# Altium PCB PCB1.PcbDoc
Units mil, origin at the board's own origin, x right, y up, seen from the top; angles counter-clockwise.
Board outline 1705 x 790 mil, 4 copper layers (Top Layer, InLayer 1, InLayer 2, Bottom Layer), stack 26.268 mil thick; 14 components, 24 nets, 115 pads, 0 vias.
Unrouted connection lines stored in the file: 50.
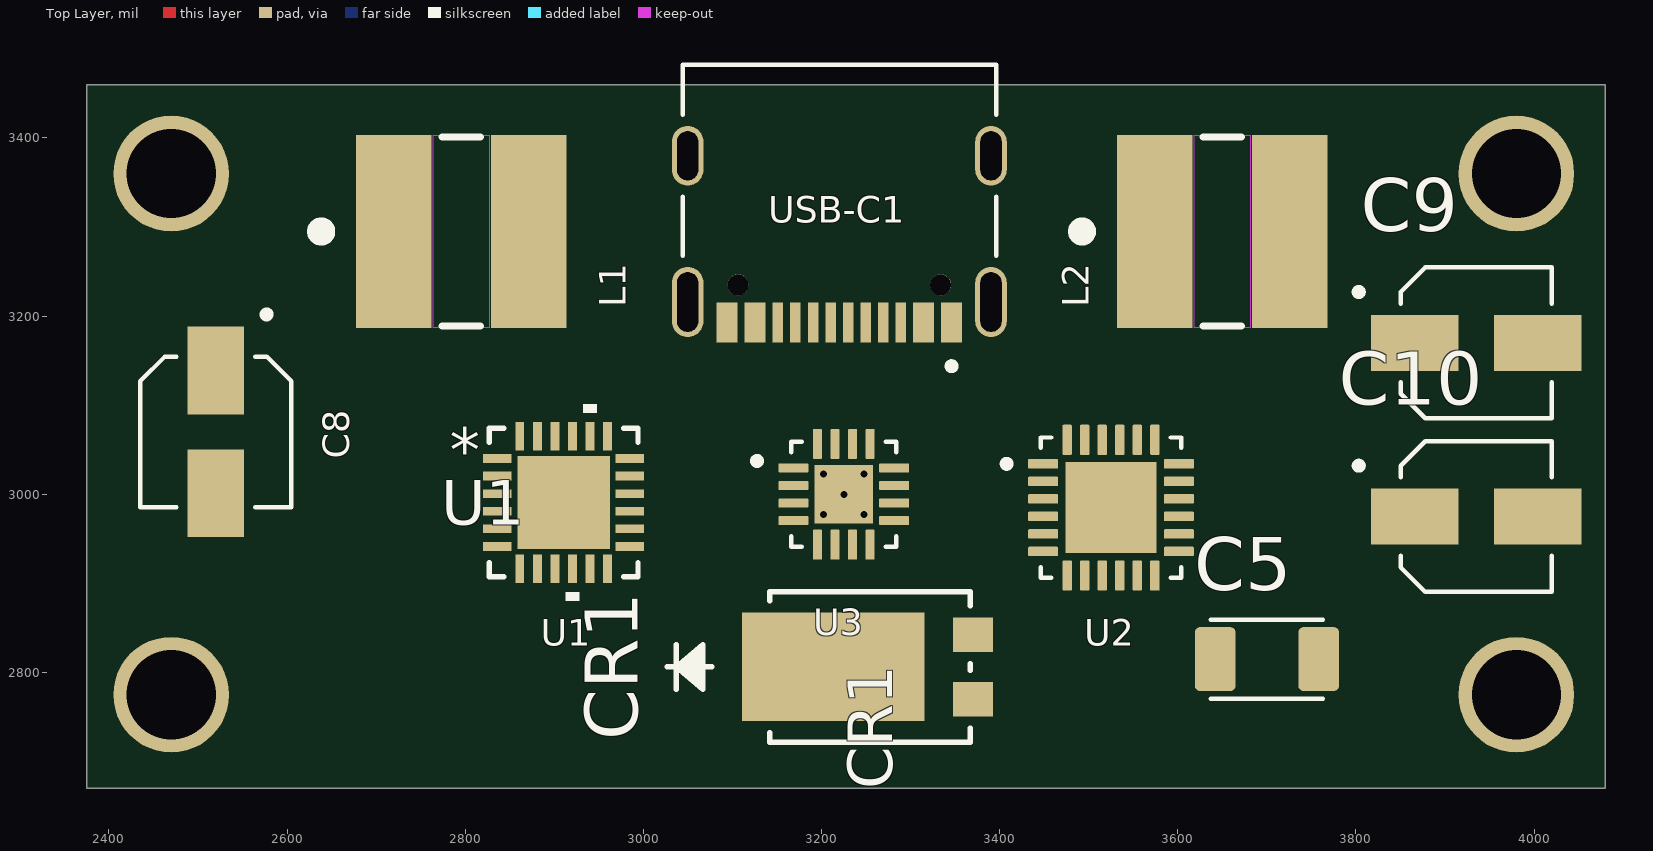
[diagram p0: Top Layer view]
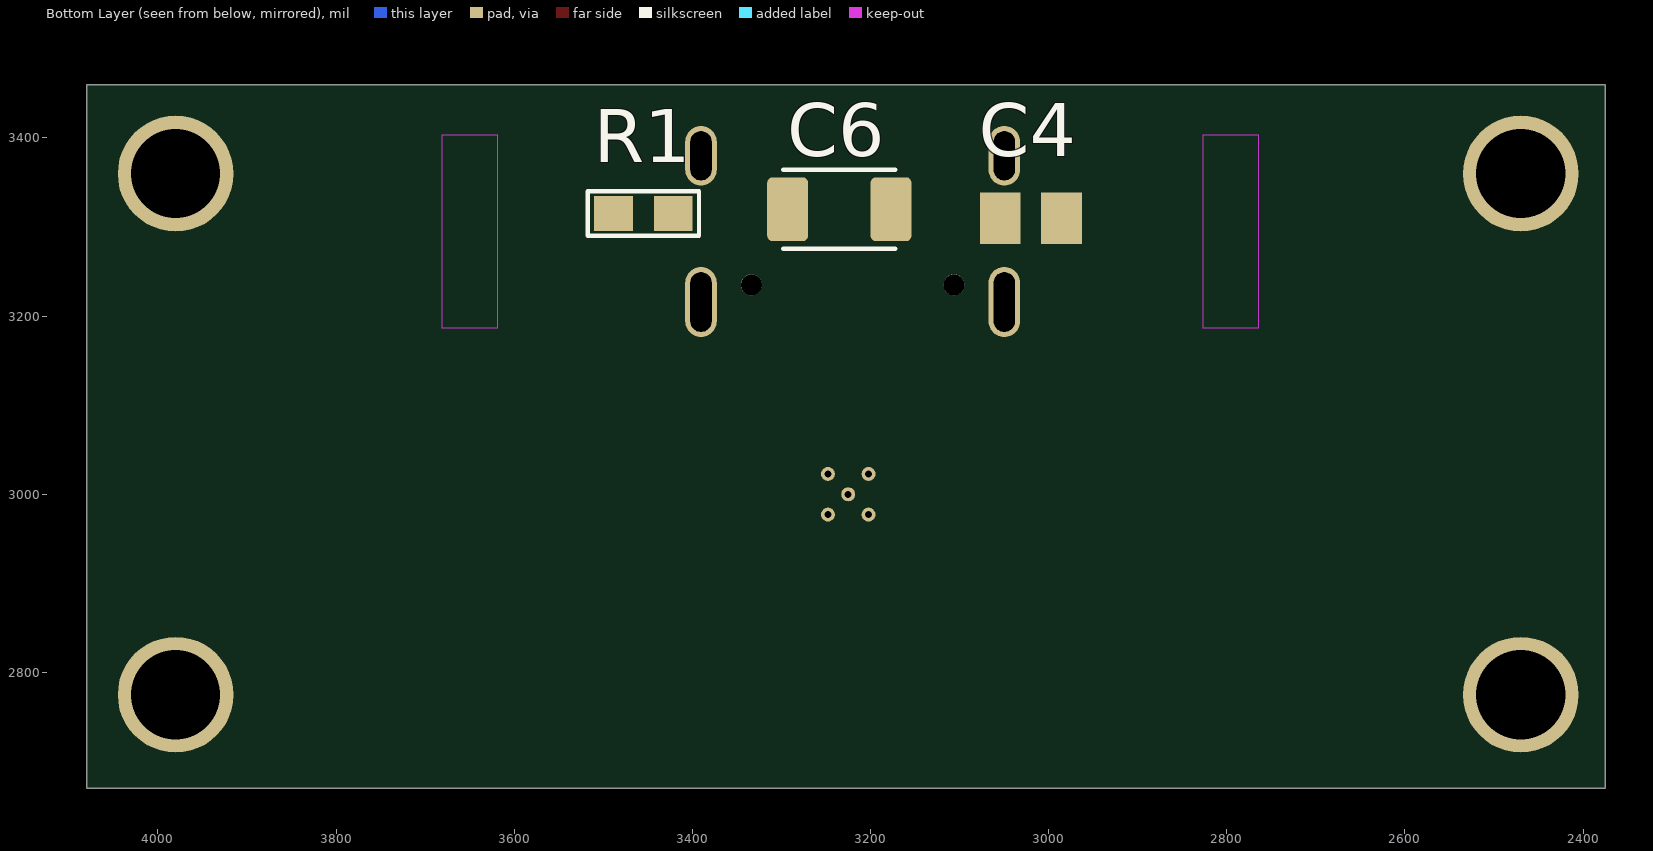
[diagram p1: Bottom Layer view, seen from below]

## Layer stack, top to bottom
Top Solder: solder mask 0.4, Solder Resist, Dk 3.5
Top Layer: signal copper 2.756
Dielectric 2: prepreg 6, PP-016, Dk 4.4
InLayer 1: signal copper 1.378
Dielectric 1: core 6, FR-4, Dk 4.1
InLayer 2: signal copper 1.378
Dielectric 3: prepreg 6, PP-016, Dk 4.4
Bottom Layer: signal copper 2.756
Bottom Solder: solder mask 0.4, Solder Resist, Dk 3.5

## Board outline
2375,2670 2375,3460 4080,3460 4080,2670

## Design rules (kind name [scope] priority, off if disabled: settings)
Clearance Clearance_1 [All] p1: gap=10 ignorepadtopadclearanceinfootprint=FALSE
Clearance [All] p2: gap=10 ignorepadtopadclearanceinfootprint=FALSE
PolygonConnect [All] p1: connectstyle=Relief reliefconductorwidth=10 reliefentries=4 polygonreliefangle="90 Angle" airgapwidth=10
RoutingVias [All] p1: holewidth=28 width=50 viastyle="Through Hole" minholewidth=28 minwidth=50 maxholewidth=28 maxwidth=50
SolderMaskExpansion [All] p1: expansion=0 istentingtop=FALSE
Width [All] p1: maxlimit=10 minlimit=10 preferedwidth=10
30 further rules are at their usual default settings.

## Classes and differential pairs
component class Sheet1: C4 C5 C6 C8 C9 C10 CR1 L1 R1 U1 U2 U3 USB-C1

## Components (designator, comment, footprint, x,y, rotation, side; value= is the part's Value field where it differs from the comment)
C4 "105" CAPC2012X88N 3020,3310 r180 bottom
C5 "4.7u" CAPC3216X110N 3700,2815 r0 top
C6 "104" CAPC3216X110N 3235,3320 r180 bottom
C8 "22uF" CAP_EEEFN1C220R 2520,3070 r270 top
C9 "47uF" CAP_EEEFN1C220R 3935,3170 r0 top
C10 "47uF" CAP_EEEFN1C220R 3935,2975 r0 top
CR1 "SBR10A45SP5-13" POWERDI5_DIO 3254.5,2806.22 r90 top
L1 "WE-PD2_5848" WE-PD2_5848 2795.79,3295 r0 top
L2 "2.2uH" WE-PD2_5848 3650,3295 r0 top
R1 "5K1" 0603 3455,3315 r180 bottom
U1 "CYPD3177-24LQXQT" QFN24_CYPD3177-24LQXQT_INF 2910.5,2990.79 r0 top
U2 "BQ25895RTWR" QFN50P400X400X80-25N 3525,2985 r0 top
U3 "TPS62133RGTR" QFN50P300X300X100-17N 3225,3000 r0 top
USB-C1 "TYPE-C-31-M-12" HRO_TYPE-C-31-M-12 3220,3380 r180 top

## Footprints (in the part's own frame and the unit in brackets; to place one, negate y for a bottom-side part, rotate by r counter-clockwise, add the part's x,y. Pads: shape width x height; smd on the part's side, far side on the other; paste and mask are expansions set on the pad)
0603 [mm]
  rect 1.1x1 smd: 1(-0.85,0) 2(0.85,0)
  silkscreen extent -1.59,-0.64 1.59,0.64, body extent -0.8,-0.4 0.8,0.4, height 0.55
CAP_EEEFN1C220R [mm]
  rect 2.5x1.6 smd: 1(-1.75,0) 2(1.75,0)
  silkscreen extent -3.45,-2.15 2.15,2.15, body extent -2.5,-2.15 2.5,2.15, height 5.3
CAPC2012X88N [mm]
  rect 1.16x1.47 smd: 1(-0.875,0) 2(0.875,0)
  body extent -1.02,-0.64 1.02,0.64, height 1.4
CAPC3216X110N [mm]
  rrect25% 1.16x1.82 smd: 1(-1.475,0) 2(1.475,0)
  silkscreen extent -1.6,-1.13 1.6,1.13, body extent -1.6,-0.8 1.6,0.8, height 1.8
HRO_TYPE-C-31-M-12 [mm]
  rect 0.6x1.14 smd mask+0.05: A1_B12(-3.2,4.75) A4_B9(-2.4,4.75) B1_A12(3.2,4.75) B4_A9(2.4,4.75)
  rect 0.3x1.14 smd mask+0.05: A5(-1.25,4.75) A6(-0.25,4.75) A7(0.25,4.75) A8(1.25,4.75) B5(1.75,4.75) B6(0.75,4.75) B7(-0.75,4.75) B8(-1.75,4.75)
  oval 0.9x2 hole 0.6 slot 1.7 at 90 deg: S1(-4.325,4.17) S2(4.325,4.17)
  oval 0.9x1.7 hole 0.6 slot 1.4 at 90 deg: S3(-4.325,0) S4(4.325,0)
  round 0.6 hole 0.6 unplated: ""(-2.89,3.68) ""(2.89,3.68)
  silkscreen extent -4.47,-2.6 4.47,6.1, body extent -4.47,-2.6 4.47,5.31, height 3.18
POWERDI5_DIO [mil]
  rect 122x205 smd paste+0 mask+0: 1(0,41.5)
  rect 39x45 smd paste+0 mask+0: 2(-36.22,-115.5) 3(36.22,-115.5)
  silkscreen extent -84,-112 84,228, body extent -79,-130 79,130, height 47
QFN24_CYPD3177-24LQXQT_INF [mil]
  rect 32x10 smd paste-99999 mask+0: 1(-74.5,49.21) 2(-74.5,29.53) 3(-74.5,9.84) 4(-74.5,-9.84) 5(-74.5,-29.53) 6(-74.5,-49.21) 13(74.5,-49.21) 14(74.5,-29.53) 15(74.5,-9.84) 16(74.5,9.84) 17(74.5,29.53) 18(74.5,49.21)
  rect 10x32 smd paste-99999 mask+0: 7(-49.21,-74.5) 8(-29.53,-74.5) 9(-9.84,-74.5) 10(9.84,-74.5) 11(29.53,-74.5) 12(49.21,-74.5) 19(49.21,74.5) 20(29.53,74.5) 21(9.84,74.5) 22(-9.84,74.5) 23(-29.53,74.5) 24(-49.21,74.5)
  rect 104x104 smd paste-99999 mask+0: 25(0,0)
  silkscreen extent -84,-110 84,110, body extent -79,-79 79,79, height 24
QFN50P300X300X100-17N [mm]
  rrect25% 0.86x0.26 smd: 1(-1.435,0.75) 2(-1.435,0.25) 3(-1.435,-0.25) 4(-1.435,-0.75) 9(1.435,-0.75) 10(1.435,-0.25) 11(1.435,0.25) 12(1.435,0.75)
  rrect25% 0.26x0.86 smd: 5(-0.75,-1.435) 6(-0.25,-1.435) 7(0.25,-1.435) 8(0.75,-1.435) 13(0.75,1.435) 14(0.25,1.435) 15(-0.25,1.435) 16(-0.75,1.435)
  rect 1.68x1.68 smd paste-2539.97: 17(0,0)
  round 0.4 hole 0.2 mask+0: 18(0,0) 19(-0.58,0.58) 20(0.58,0.58) 21(-0.58,-0.58) 22(0.58,-0.58)
  silkscreen extent -2.57,-1.5 1.5,1.5, body extent -1.5,-1.5 1.5,1.5, height 1
QFN50P400X400X80-25N [mm]
  rrect25% 0.86x0.27 smd: 1(-1.935,1.25) 2(-1.935,0.75) 3(-1.935,0.25) 4(-1.935,-0.25) 5(-1.935,-0.75) 6(-1.935,-1.25) 13(1.935,-1.25) 14(1.935,-0.75) 15(1.935,-0.25) 16(1.935,0.25) 17(1.935,0.75) 18(1.935,1.25)
  rrect25% 0.27x0.86 smd: 7(-1.25,-1.935) 8(-0.75,-1.935) 9(-0.25,-1.935) 10(0.25,-1.935) 11(0.75,-1.935) 12(1.25,-1.935) 19(1.25,1.935) 20(0.75,1.935) 21(0.25,1.935) 22(-0.25,1.935) 23(-0.75,1.935) 24(-1.25,1.935)
  rect 2.6x2.6 smd paste-2539.97: 25(0,0)
  silkscreen extent -3.07,-2 2,2, body extent -2,-2 2,2, height 0.8
WE-PD2_5848 [mm]
  rect 2.15x5.5 smd paste-2539.97 mask+0.102: 1(-1.925,0) 2(1.925,0)
  Keep-Out Layer region: 0.8,-2.75 -0.8,-2.75 -0.8,2.75 0.8,2.75
  silkscreen extent -4.2,-2.7 0.55,2.7, body extent -2.89,-2.6 2.9,2.6, height 4.5

## Part data
C4: library part C0805F104K5RACTU, "0805 C 100nF Ceramic Multilayer Capacitor, 50 VDC, +125degC, X7R Dielec, +/-10%", Package="0805 Kemet", Check_prices=https://www.snapeda.com/parts/C0805F104K5RACTU/KEMET/view-part/?ref=eda, MF=KEMET, MP=C0805F104K5RACTU, SnapEDA_Link=https://www.snapeda.com/parts/C0805F104K5RACTU/KEMET/view-part/?ref=snap
C5 C6: library part C1206C475K5RACTU, "4.7 ÂµF Â±10% 50V Ceramic Capacitor X7R 1206 (3216 Metric)", Package="1206-2 KEMET", Check_prices=https://www.snapeda.com/parts/C1206C475K5RACTU/KEMET/view-part/?ref=eda, MF=KEMET, MP=C1206C475K5RACTU, SnapEDA_Link=https://www.snapeda.com/parts/C1206C475K5RACTU/KEMET/view-part/?ref=snap
C8 C9 C10: library part EEEFN1C220R, "CAP ALUM 22UF 20% 16V SMD", Package="RADIAL-2 Panasonic", Availability="In Stock", Check_prices=https://www.snapeda.com/parts/EEE-FN1C220R/Panasonic/view-part/6178704/?ref=eda, MF="Panasonic Electronic Components", MP=EEE-FN1C220R, Price=None, Purchase-URL=https://pricing.snapeda.com/search/part/EEE-FN1C220R/?ref=eda, SnapEDA_Link=https://www.snapeda.com/parts/EEE-FN1C220R/Panasonic/view-part/6178704/?ref=snap
CR1: "No Description Available", Manufacturer_Name="Diodes Inc", Copyright="Copyright (C) 2026 Ultra Librarian. All rights reserved.", Manufacturer_Part_Number=SBR10A45SP5-13, RefDes=RefDes, Type=Type
L1: "2.2 ÂµH Unshielded Drum Core, Wirewound Inductor 4.6 A 41mOhm Max Nonstandard", Package="Nonstandard Wurth Electronics", Check_prices=https://www.snapeda.com/parts/744774022/W%25C3%25BCrth+Elektronik+Midcom/view-part/?ref=eda, MF="WÃ¼rth Elektronik", MP=744774022, SnapEDA_Link=https://www.snapeda.com/parts/744774022/W%25C3%25BCrth+Elektronik+Midcom/view-part/?ref=snap
L2: library part WE-PD2_5848, "2.2 ÂµH Unshielded Drum Core, Wirewound Inductor 4.6 A 41mOhm Max Nonstandard", Package="Nonstandard Wurth Electronics", Check_prices=https://www.snapeda.com/parts/744774022/W%25C3%25BCrth+Elektronik+Midcom/view-part/?ref=eda, MF="WÃ¼rth Elektronik", MP=744774022, SnapEDA_Link=https://www.snapeda.com/parts/744774022/W%25C3%25BCrth+Elektronik+Midcom/view-part/?ref=snap
R1: library part RT0603BRD0710KL, "10 kOhms Â±0.1% 0.1W, 1/10W Chip Resistor 0603 (1608 Metric) - Thin Film", Package="SMD-2 Yageo", Check_prices=https://www.snapeda.com/parts/RT0603BRD0710KL/Yageo/view-part/?ref=eda, MF=Yageo, MP=RT0603BRD0710KL, SnapEDA_Link=https://www.snapeda.com/parts/RT0603BRD0710KL/Yageo/view-part/?ref=snap
U1: "EZ-PDâ„¢ Barrel Connector Replacement (BCR) CYPD3177-24LQXQT is the tape and reel packing type option of EZ-PDâ„¢ BCR family, the highly-integrated USB Type-C port controllers for power sink applications. It targets electronic devices using legacy barrel connectors up to 100 W or USB micro-B for power inputs, enabling product designers to replace these incompatible connectors with USB-C.EZ-PDâ„¢ BCR complies with USB Type-C and USB 3.0 Power Delivery (PD) standards and enables users to quickly convert their devices from being powered through a barrel connector to being powered via the USB-C connector with few external components and no firmware development is required. It integrates a complete USB Type-C transceiver, USB PD policy manager, a load switch controller with a soft start, all termination resistors required for a USB Type-C port, and system-level ESD protection. It is available in a 24-pin QFN package.", Manufacturer_Name=Infineon, Copyright="Copyright (C) 2026 Ultra Librarian. All rights reserved.", Manufacturer_Part_Number=CYPD3177-24LQXQT, RefDes=RefDes, Type=Type
U2: "I2C 1cell 5A buck battery charger with high input voltage and 3.1-A boost with HVDCP enabled", Package="WQFN-24 Texas Instruments", Check_prices=https://www.snapeda.com/parts/BQ25895RTWR/Texas+Instruments/view-part/?ref=eda, MF="Texas Instruments", MP=BQ25895RTWR, SnapEDA_Link=https://www.snapeda.com/parts/BQ25895RTWR/Texas+Instruments/view-part/?ref=snap
U3: "3-17V 3A Step-Down Converter in 3x3 QFN Package", Package="VQFN-16 Texas Instruments", Check_prices=https://www.snapeda.com/parts/TPS62133RGTR/Texas+Instruments/view-part/?ref=eda, MF="Texas Instruments", MP=TPS62133RGTR, SnapEDA_Link=https://www.snapeda.com/parts/TPS62133RGTR/Texas+Instruments/view-part/?ref=snap
USB-C1: "USB Connectors 24 Receptacle 1 8.94*7.3mm RoHS", Package=Package, Check_prices=https://www.snapeda.com/parts/TYPE-C-31-M-12/HRO+Electronics+Co.%252C+Ltd./view-part/?ref=eda, MF="HRO Electronics Co., Ltd.", MP=TYPE-C-31-M-12, SnapEDA_Link=https://www.snapeda.com/parts/TYPE-C-31-M-12/HRO+Electronics+Co.%252C+Ltd./view-part/?ref=snap

## Free pads (board coordinates)
  round 130 hole 100: B2(2470,2775) B2(2470,3360) B2(3980,2775) B2(3980,3360)

## Nets (pads, with @x,y where several pads share a name; then routed paths per layer and width w, separated by ;. In a path a pad name is that pad's centre, name@x,y a point inside that pad or via, vN(x,y) a via of type N, cw(c..) or ccw(c..) an arc to the next point about the centre after c; other vN are vias at no path point)
\: C4.2 C5.2 C6.2 C8.2 C9.2 C10.2 U1.19 U1.22 U1.25 U2.8 U2.9 U2.17 U2.18 U2.25 USB-C1.A1_B12 USB-C1.B1_A12 USB-C1.S1 USB-C1.S2 USB-C1.S3 USB-C1.S4
BAT: U2.13 U2.14
BTST: U2.21
CC1: U1.15 USB-C1.A5
CC2: U1.14 USB-C1.B5
ILIM: U2.10
ISNK_C: U1.5
ISNK_F: U1.6
NetLabel8: U3.2 U3.7 U3.9 U3.13 U3.14 U3.15
NetLabel9: U3.1 U3.3 U3.4 U3.5 U3.6 U3.8 U3.16
REGN: C5.1 U2.22
SCL: U2.5
SDA: U2.6
SYS: C8.1 L2.2 U2.15 U2.16
TMPS: U2.11
UDN: USB-C1.A7 USB-C1.B7
UDP: USB-C1.A6 USB-C1.B6
V1_1.8: C4.1 U1.24
V1_3.3: R1.2 U1.23
V2OUT: C9.1 C10.1 U2.23
V2SW: L2.1 U2.19 U2.20
VBUS: U1.11 U1.18 U2.1 USB-C1.A4_B9 USB-C1.B4_A9
VBUS_H: R1.1 U1.2
VBUS_L: U1.1
pads on no net: C6.1 CR1.1 CR1.2 CR1.3 L1.1 L1.2 U1.3 U1.4 U1.7 U1.8 U1.9 U1.10 U1.12 U1.13 U1.16 U1.17 U1.20 U1.21 U2.2 U2.3 U2.4 U2.7 U2.12 U2.24 U3.10 U3.11 U3.12 U3.17 U3.18 U3.19 U3.20 U3.21 U3.22 USB-C1. USB-C1.A8 USB-C1.B8

## Silkscreen, mask and mechanical layers (free items; w line width, h text height)
Mechanical 15:
  the board outline again, w10

## Text inside footprints (layer, text, board x,y; h text height)
U1: Top Overlay "*" at 2782.5,3024.84 h50; Mechanical 13 "*" at 2839.5,3024.84 h50
USB-C1: Mechanical 13 "PCB EDGE" at 3015.28,3454.8 h24 r180